# Altium PCB PCB_Z35.PcbDoc (part 3 of 3)
Units mm, origin at the board's own origin, x right, y up, seen from the top; angles counter-clockwise.
Board outline 116.46 x 196.34 mm, 2 copper layers (Top Layer, Bottom Layer), stack 1.671 mm thick; 178 components, 183 nets, 705 pads, 291 vias.
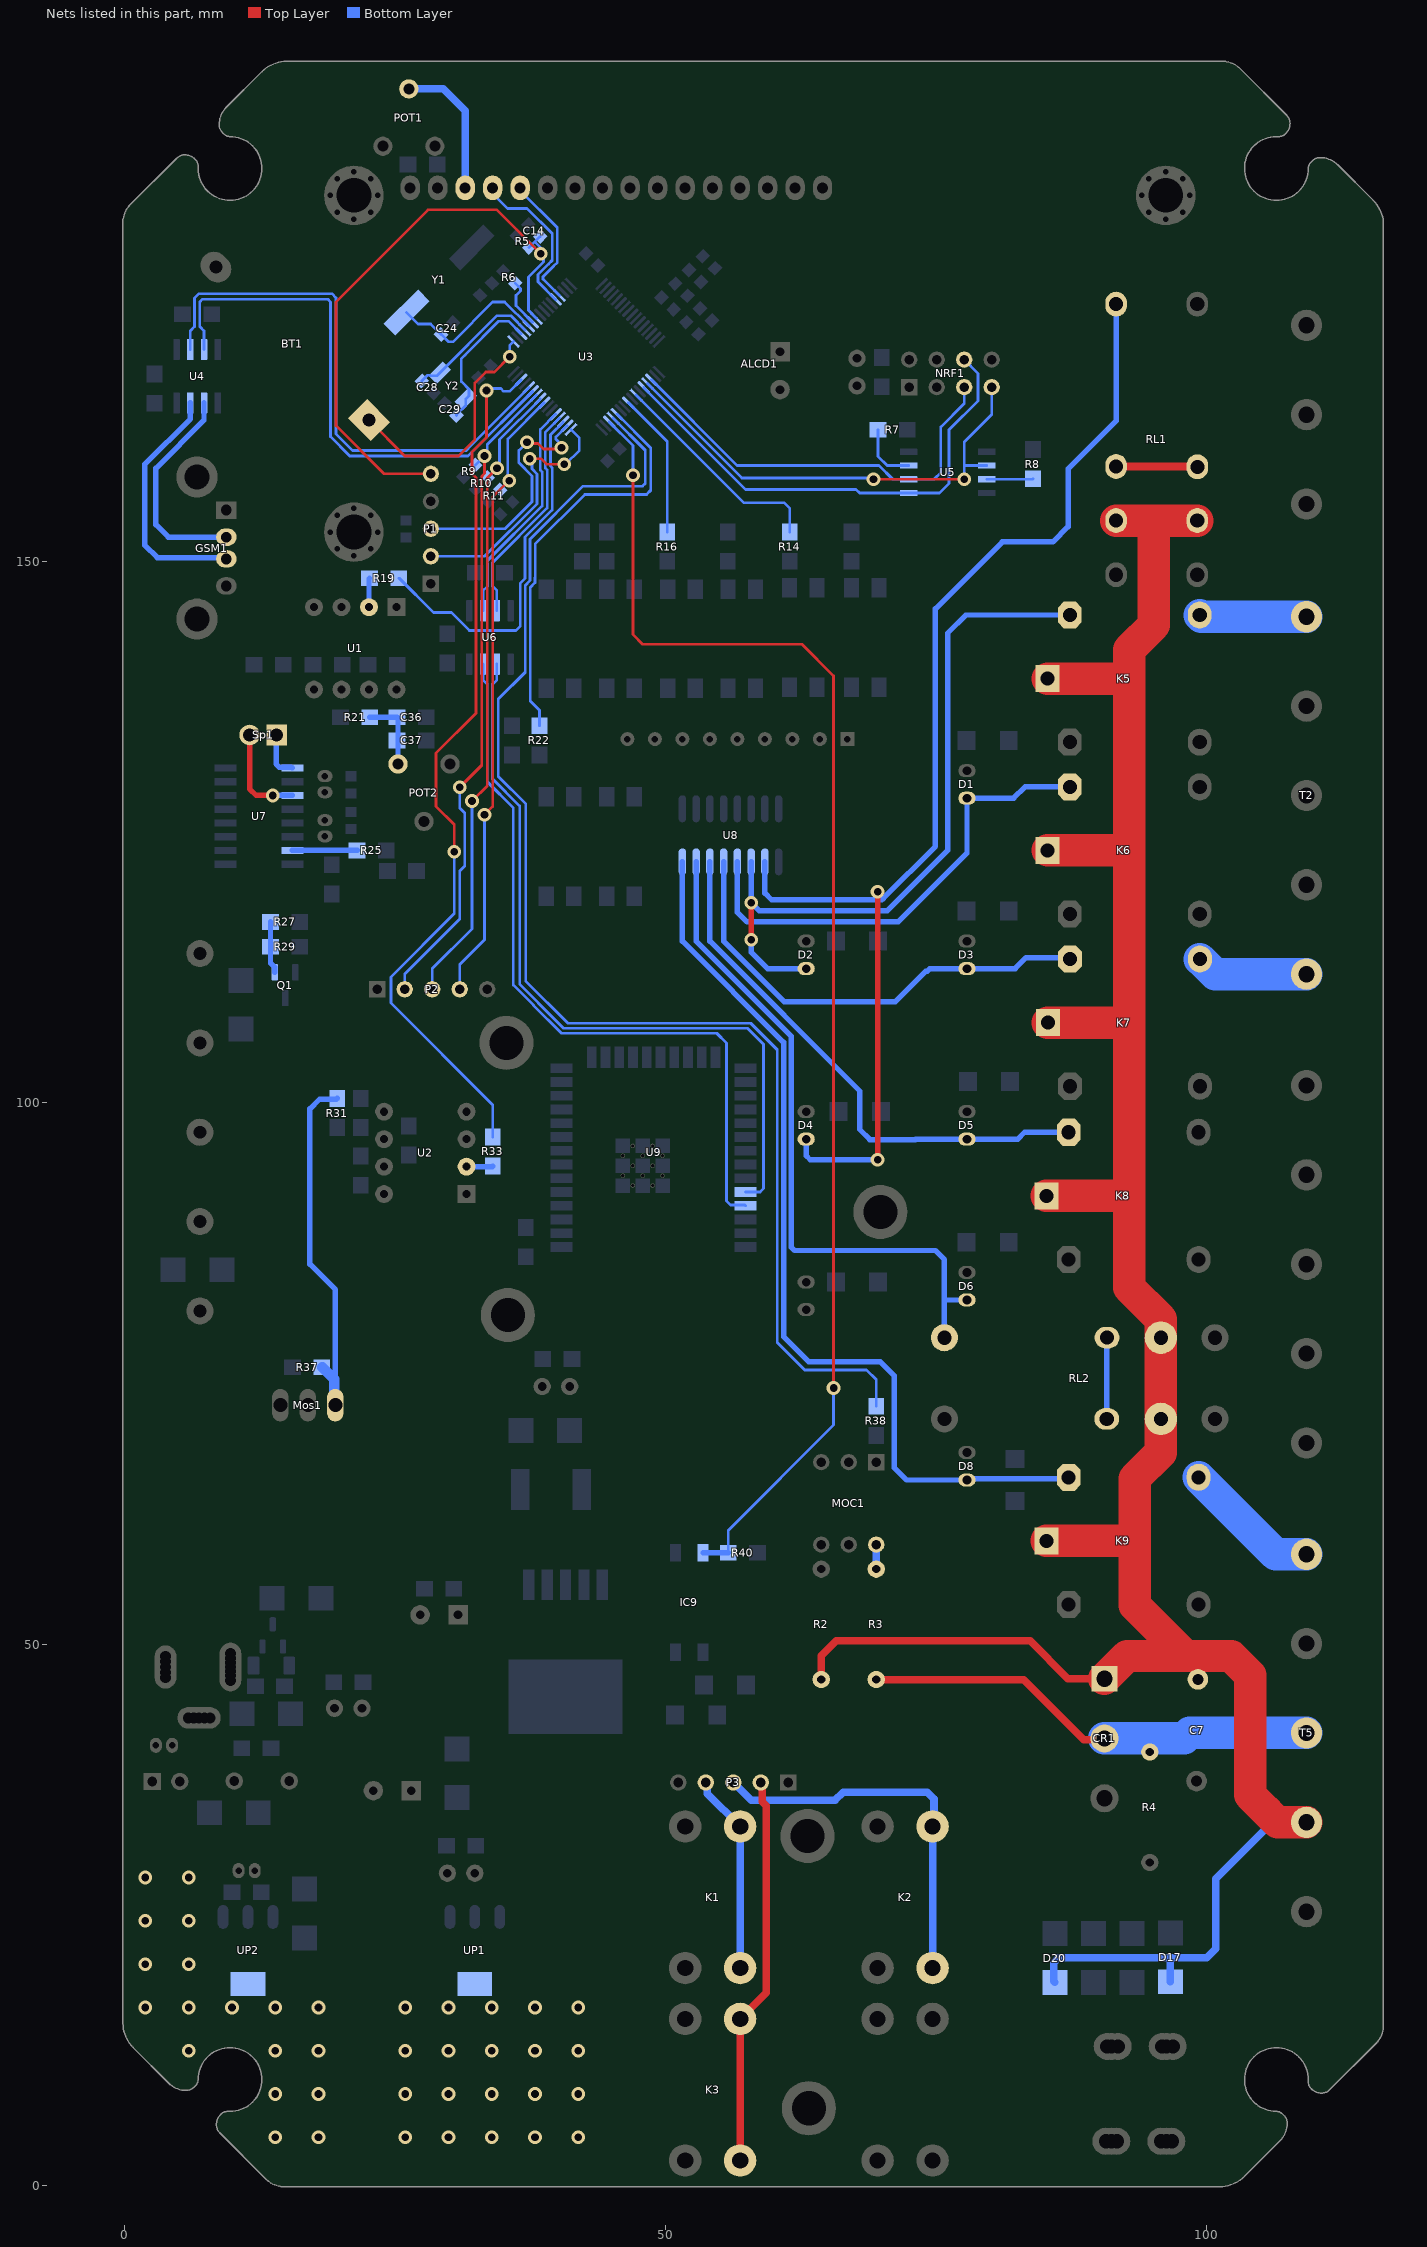
[diagram p3: the nets of this part, all layers, seen from the top]

## Via types
v1: diameter 1.27, hole 0.711, Top Layer to Bottom Layer, tented both sides, 237 vias
v2: diameter 0.5, hole 0.3, Top Layer to Bottom Layer, 40 vias
v3: diameter 1.6, hole 1, Top Layer to Bottom Layer, tented both sides, 8 vias
v4: diameter 0.5, hole 0.3, Top Layer to Bottom Layer, tented both sides, 6 vias

## Nets (pads, with @x,y where several pads share a name; then routed paths per layer and width w, separated by ;. In a path a pad name is that pad's centre, name@x,y a point inside that pad or via, vN(x,y) a via of type N, cw(c..) or ccw(c..) an arc to the next point about the centre after c; other vN are vias at no path point) (continued)
NetMOC1_6: MOC1.6 R3.1 | length 2.3
  Bottom Layer w0.7: R3.1@69.469,56.916 MOC1.6@69.469,59.182
NetMos1_1: Mos1.1 R31.1 R37.2 | length 35.1
  Bottom Layer w0.5: Mos1.1@19.495,72.072 19.495,82.74 17.145,85.09 17.145,99.441 18.034,100.33 19.605,100.33 R31.1@19.685,100.41
  Bottom Layer w1: R37.2@18.292,75.565 19.398,74.458 Mos1.1@19.398,72.169
NetQ1_1: Q1.1 R27.2 R29.1 | length 4.8
  Bottom Layer w0.5: R27.2@13.509,116.713 R29.1@13.509,114.427 13.509,112.911 13.909,112.511 Q1.1@13.909,112.061
NetQ4_1: 
NetQ5_1: 
NetQ6_1: 
NetQ6_3: 
NetQ7_1: 
NetQ7_4: 
NetQ7_5: 
NetR7_1: R7.1 U5.7 | length 5.6
  Bottom Layer w0.254: R7.1@69.643,162.179 69.643,159.719 70.485,158.877 U5.7@72.468,158.877
NetR8_1: R8.1 U5.3 | length 4.3
  Bottom Layer w0.254: U5.3@79.678,157.607 83.9,157.607 R8.1@83.947,157.654
NetR19_1: R19.1 U1.2 | length 2.7
  Bottom Layer w0.5: U1.2@22.606,145.796 22.606,148.416 R19.1@22.653,148.463
NetR25_2: R25.2 U7.7 | length 6
  Bottom Layer w0.5: U7.7@15.519,123.317 R25.2@21.51,123.317
NetR33_1: R33.1 U2.2 | length 2.4
  Bottom Layer w0.5: U2.2@31.623,94.107 33.989,94.107 R33.1@34.036,94.154
NetR60_1: 
NetR61_1: 
NetR62_1: 
NetR71_1: 
NetR72_1: 
NetR73_2: 
NetR76_1: 
NetRL1_12: RL1.12 RL1.22 | length 7.5
  Top Layer w0.4: RL1.12@99.107,158.79 cw(c99.107,158.76) RL1.12@99.137,158.76
  Top Layer w0.7: RL1.22@91.627,158.79 RL1.12@99.107,158.79
NetRL2_12: RL2.12 RL2.22 | length 7.5
  Bottom Layer w0.5: RL2.22@90.765,70.799 90.78,70.814 90.78,78.294 RL2.12@90.795,78.309
NetSp1_1: Sp1.1 U7.1 | length 4.4
  Bottom Layer w0.5: Sp1.1@14.077,133.985 14.021,133.929 14.021,131.31 14.314,131.017 15.439,131.017 U7.1@15.519,130.937
NetSp1_2: Sp1.2 U7.3 | length 9.2
  Top Layer w0.5: Sp1.2@11.577,133.985 11.577,129.012 12.192,128.397 v1(13.716,128.397)
  Bottom Layer w0.5: v1(13.716,128.397) U7.3@15.519,128.397
"Night lamp": R22.2 U3.44 | length 38.4
  Bottom Layer w0.254: R22.2@38.354,134.827 38.354,136.271 37.504,137.121 37.504,147.606 37.952,148.054 37.952,148.507 37.955,148.511 37.955,151.62 42.545,156.21 48.26,156.21 48.641,156.591 48.641,160.49 U3.44@45.511,163.621
"Night lamp out": K9.3 T5.5 | length 12.9
  Bottom Layer w3: K9.3@99.249,65.405 106.361,58.293 T5.5@109.22,58.293
NRST: C14.1 P1.5 R5.1 U3.7 | length 56.2
  Top Layer w0.254: P1.5@28.321,158.115 24.003,158.115 19.558,162.56 19.558,173.99 28.067,182.499 34.417,182.499 v1(38.481,178.435)
  Bottom Layer w0.254: R5.1@37.396,179.012 38.404,180.021 C14.1@38.434,180.021 ; 37.996,179.473 v1@38.735,178.734 ; U3.7@38.086,172.459 38.086,172.477 37.338,173.225 37.338,176.276 38.735,177.673 v1@38.735,178.734 ; v1(38.481,178.435) 38.481,178.48 v1@38.735,178.734
OSC32_IN: C29.1 U3.3 Y2.2 | length 13.5
  Bottom Layer w0.254: C29.1@30.687,163.511 30.687,163.575 31.555,164.443 Y2.2@31.555,165.041 31.838,165.324 31.838,165.922 31.138,166.622 31.138,168.752 31.459,169.074 31.474,169.074 31.623,169.222 31.623,169.237 34.598,172.212 35.505,172.212 U3.3@36.672,171.045
OSC32_OUT: C28.1 U3.4 Y2.1 | length 12.6
  Bottom Layer w0.254: C28.1@27.479,166.689 28.006,167.216 28.216,167.216 28.27,167.162 28.868,167.162 Y2.1@29.151,167.445 29.16,167.445 34.435,172.72 35.704,172.72 U3.4@37.025,171.399
OSC_IN: C24.1 U3.5 Y1.1 | length 14.9
  Bottom Layer w0.254: Y1.1@26.078,173.017 27.137,171.958 28.303,171.958 C24.1@29.272,170.989 29.29,170.989 29.972,170.307 30.353,170.307 34.036,173.99 35.141,173.99 U3.5@37.379,171.752
OSC_OUT: R6.2 U3.6 | length 4.6
  Bottom Layer w0.254: R6.2@36.126,175.71 36.609,175.227 36.609,175.017 36.195,174.603 36.195,173.643 U3.6@37.732,172.106
output1: D8.2 K9.5 U8.16 | length 84.6
  Bottom Layer w0.5: U8.16@51.562,122.264 51.562,114.935 60.912,105.585 60.912,78.407 63.246,76.073 69.85,76.073 71.12,74.803 71.12,66.294 72.263,65.151 D8.2@77.851,65.151 77.978,65.278 87.122,65.278 K9.5@87.249,65.405
output2: D6.2 RL2.A1 U8.15 | length 63.2
  Bottom Layer w0.5: U8.15@52.832,122.264 52.832,114.935 61.622,106.145 61.622,86.653 61.915,86.36 74.93,86.36 75.765,85.525 75.765,81.788 ; RL2.A1@75.765,78.299 75.765,81.788 ; D6.2@77.851,81.788 75.765,81.788
output3: D5.2 K8.5 U8.14 | length 50.4
  Bottom Layer w0.5: U8.14@54.102,122.264 54.102,114.935 67.945,101.092 67.945,97.536 68.881,96.6 73.081,96.6 73.128,96.647 D5.2@77.851,96.647 82.55,96.647 83.185,97.282 K8.5@87.249,97.282
output4: D3.2 K7.5 U8.13 | length 43.4
  Bottom Layer w0.5: U8.13@55.372,122.264 55.372,114.935 60.96,109.347 71.247,109.347 74.041,112.141 74.168,112.141 74.422,112.395 D3.2@77.851,112.395 82.296,112.395 83.312,113.411 87.249,113.411 K7.5@87.376,113.284
output5: D1.2 K6.5 U8.12 | length 43.9
  Bottom Layer w0.5: U8.12@56.642,122.264 56.642,117.602 57.531,116.713 71.501,116.713 77.851,123.063 D1.2@77.851,128.143 82.169,128.143 83.218,129.192 K6.5@87.354,129.192
output6: D2.2 K5.5 U8.11 | length 66.9
  Top Layer w0.5: v1(57.912,115.062) v1(57.912,118.491)
  Bottom Layer w0.5: v1(57.912,115.062) 57.912,113.919 59.436,112.395 D2.2@62.992,112.395 ; U8.11@57.912,122.264 v1(57.912,118.491) 58.674,117.729 70.485,117.729 76.073,123.317 76.073,143.383 77.757,145.067 K5.5@87.354,145.067
output7: D4.2 RL1.A2 U8.10 | length 114.6
  Top Layer w0.5: v1(69.596,94.742) v1(69.596,119.507)
  Bottom Layer w0.5: U8.10@59.182,122.264 59.182,119.38 59.817,118.745 69.977,118.745 70.104,118.872 ; D4.2@62.992,96.647 62.992,95.123 63.373,94.742 v1(69.596,94.742) ; v1(69.596,119.507) 69.596,119.38 70.104,118.872 ; RL1.A2@91.627,173.79 91.627,163.001 87.197,158.571 87.197,153.237 85.788,151.828 81.13,151.828 74.93,145.629 74.93,123.698 70.104,118.872
P220: C7.2 CR1.1 D17.1 D20.2 K5.1 K6.1 K7.1 K8.1 K9.1 R2.2 RL1.11 RL1.21 RL2.11 RL2.21 T5.2 | length 257.8
  Top Layer w0.7: R2.2@64.389,46.716 64.389,48.895 65.786,50.292 83.693,50.292 87.185,46.8 CR1.1@90.551,46.8 ; C7.2@99.187,46.736 99.418,46.967 99.418,48.237 100.076,48.895
  Top Layer w3: K9.1@85.199,59.53 93.345,59.53 ; K8.1@85.199,91.407 92.837,91.407 ; K6.1@85.304,123.317 92.837,123.317 ; K5.1@85.304,139.192 92.837,139.192 ; K7.1@85.326,107.409 92.837,107.409 ; CR1.1@90.551,46.8 92.646,48.895 98.044,48.895 ; RL1.21@91.627,153.79 95.123,153.79 ; RL1.11@99.127,153.79 95.123,153.79 ; T5.2@109.22,33.528 106.553,33.528 105.539,34.542 104.013,36.068 104.013,47.138 102.256,48.895 100.076,48.895 98.044,48.895 ; 92.837,91.407 92.837,82.938 95.765,80.01 RL2.11@95.765,78.299 RL2.21@95.765,70.799 95.758,70.792 95.758,67.691 93.345,65.278 93.345,59.53 ; 92.837,91.407 92.837,107.409 ; 92.837,107.409 92.837,123.317 ; 92.837,123.317 92.837,139.192 ; 92.837,139.192 92.837,141.859 95.123,144.145 95.123,153.79 ; 93.345,59.53 93.345,53.594 98.044,48.895
  Bottom Layer w0.7: D20.2@85.979,18.741 85.852,18.868 85.852,20.574 86.284,21.006 96.647,21.006 ; D17.1@96.647,18.796 96.647,21.006 ; T5.2@109.22,33.528 106.045,33.528 100.838,28.321 100.838,21.844 100,21.006 96.647,21.006
PAM8403: C36.1 C37.1 POT2.2 R21.1 | length 6.9
  Bottom Layer w0.5: R21.1@22.686,135.636 C36.1@25.193,135.636 25.286,135.543 POT2.2@25.286,131.301
"PAM8403 STM32": R19.2 U3.51 | length 34.1
  Bottom Layer w0.254: R19.2@25.353,148.463 25.403,148.463 28.578,145.288 30.226,145.288 31.877,143.637 36.195,143.637 36.576,144.018 36.576,147.99 37.024,148.438 37.024,148.892 37.027,148.895 37.027,152.258 39.531,154.762 39.531,158.674 39.365,158.84 39.365,161.718 U3.51@40.561,162.914
RS: ALCD1.4 U3.12 | length 14.9
  Bottom Layer w0.254: ALCD1.4@34.036,184.531 34.036,184.005 35.415,182.626 37.211,182.626 39.541,180.296 39.541,177.844 39.199,177.502 39.199,177.481 38.227,176.509 38.227,175.854 U3.12@39.854,174.227
RW: ALCD1.5 U3.13 | length 12.5
  Bottom Layer w0.254: ALCD1.5@36.576,184.531 36.576,184.277 40.005,180.848 40.005,177.652 39.663,177.31 39.663,177.289 38.691,176.317 38.691,176.097 U3.13@40.207,174.581
"RXD ESP32": U6.6 U9.34 | length 70.8
  Bottom Layer w0.254: U6.6@34.417,140.532 34.417,139.065 33.992,138.64 33.992,129.965 36.523,127.434 36.523,110.966 38.266,109.223 38.266,109.202 40.578,106.89 57.575,106.89 59.055,105.41 59.055,92.075 58.748,91.768 U9.34@57.395,91.768
"RXD GSM": GSM1.2 U4.6 | length 20.1
  Bottom Layer w0.5: U4.6@7.366,164.662 7.366,163.068 2.921,158.623 2.921,153.416 4.08,152.257 GSM1.2@9.427,152.257
SCL: 
SCL_ADC_PIR: 
SDA: 
"Setting button 1": P2.2 R9.2 U3.58 | length 61.1
  Top Layer w0.254: v1(30.988,129.159) 33.02,131.191 33.02,157.882 33.274,158.136 v1(33.274,159.766)
  Bottom Layer w0.254: P2.2@25.908,110.49 25.908,111.887 30.988,116.967 30.988,121.412 31.452,121.876 31.452,126.79 30.988,127.254 v1(30.988,129.159) ; R9.2@32.443,158.935 v1(33.274,159.766) ; v1@33.528,160.02 33.528,160.83 U3.58@38.086,165.388
"Setting button 1 K": K1.1 P3.4 | length 18.5
  Bottom Layer w0.7: P3.4@53.721,37.211 53.87,37.062 53.87,36.173 K1.1@56.896,33.147 K1.1@56.896,20.066
"Setting button 2": P2.4 R11.2 U3.56 | length 58.7
  Top Layer w0.254: v1(33.274,126.619) 34.036,127.381 34.036,155.956 v1(35.56,157.48)
  Bottom Layer w0.254: P2.4@30.988,110.49 30.988,112.776 33.274,115.062 v1(33.274,126.619) ; R11.2@34.729,156.649 v1(35.56,157.48) 35.433,157.607 35.433,161.321 U3.56@38.793,164.681
"Setting button 2 K": K3.1 P3.2 | length 36.1
  Top Layer w0.7: K3.1@56.896,2.286 K3.1@56.896,15.367 59.309,17.78 59.309,35.052 58.95,35.411 58.95,37.062 P3.2@58.801,37.211
"SPI2 MISO": NRF1.7 U3.36 U5.2 | length 44.6
  Top Layer w0.254: v1(69.215,157.607) v1(77.597,157.607)
  Bottom Layer w0.254: U3.36@48.339,166.449 57.054,157.734 69.088,157.734 v1(69.215,157.607) ; v1(77.597,157.607) 77.597,158.877 ; U5.2@79.678,158.877 77.597,158.877 ; NRF1.7@80.137,166.116 80.137,163.576 77.597,161.036 77.597,158.877
"SPI2 MOSI": NRF1.6 U3.37 U5.5 | length 45.7
  Bottom Layer w0.254: U3.37@47.986,166.096 57.407,156.674 67.608,156.674 67.945,156.337 U5.5@72.468,156.337 75.311,156.337 76.2,157.226 76.2,162.179 78.867,164.846 78.867,167.386 NRF1.6@77.597,168.656
"SPI2 SCK": NRF1.5 U3.35 U5.6 | length 39.6
  Bottom Layer w0.254: U3.35@48.693,166.803 56.618,158.877 69.723,158.877 70.993,157.607 U5.6@72.468,157.607 74.803,157.607 75.438,158.242 75.438,162.433 77.597,164.592 NRF1.5@77.597,166.116
"Status botton": 
Sun: R38.2 U3.45 | length 129.1
  Bottom Layer w0.254: U3.45@45.157,163.267 48.133,160.291 48.133,157.226 47.879,156.972 42.397,156.972 37.491,152.066 37.491,148.703 37.488,148.7 37.488,148.246 37.04,147.798 37.04,139.783 34.544,137.287 34.544,135.763 34.544,130.175 37.084,127.635 37.084,111.252 40.982,107.354 57.873,107.354 60.325,104.902 60.325,77.851 62.865,75.311 68.58,75.311 69.469,74.422 R38.2@69.469,71.962
"Sun 12v LED": R33.2 U3.62 | length 82
  Top Layer w0.254: v1(30.48,123.19) 30.48,125.719 28.807,127.392 28.807,132.312 32.49,135.995 32.49,157.756 32.124,158.122 32.124,160.14 33.463,161.479 v1(33.463,165.8)
  Bottom Layer w0.254: v1(30.48,123.19) 30.48,117.475 24.638,111.633 24.638,109.22 34.036,99.822 R33.2@34.036,96.854 ; v1(33.463,165.8) 33.486,165.777 33.697,165.777 33.909,165.989 34.798,165.989 35.052,165.735 35.604,165.735 U3.62@36.672,166.803
"Sun out": CR1.2 R3.2 R4.2 T5.3 | length 42.3
  Top Layer w0.7: R3.2@69.469,46.716 83.078,46.716 88.646,41.148 90.424,41.148 CR1.2@90.551,41.275
  Bottom Layer w3: CR1.2@90.551,41.275 97.917,41.275 98.425,41.783 T5.3@109.22,41.783
SWCLK: P1.3 U3.50 | length 22.9
  Top Layer w0.254: v1(37.211,161.036) 37.338,160.909 38.227,160.909 38.735,160.401 40.259,160.401 v1(40.386,160.528)
  Bottom Layer w0.254: P1.3@28.321,153.035 35.179,153.035 37.675,155.531 37.675,157.905 36.449,159.131 36.449,160.274 v1(37.211,161.036) ; v1(40.386,160.528) 40.386,160.782 39.866,161.302 39.866,161.512 U3.50@40.914,162.56
SWDIO: P1.2 U3.49 | length 23.8
  Top Layer w0.254: v1(37.465,159.512) 38.481,159.512 38.989,159.004 v1(40.64,159.004)
  Bottom Layer w0.254: P1.2@28.321,150.495 33.295,150.495 38.139,155.339 38.139,158.097 37.659,158.577 37.659,159.318 v1(37.465,159.512) ; v1(40.64,159.004) 40.767,159.004 42.037,160.274 42.037,161.437 U3.49@41.268,162.206
"Tab 3.3 stm32": UP2.4
  other v1: 13.947,4.424 17.947,4.424 13.947,8.424 17.947,8.424 5.947,12.424 13.947,12.424 17.947,12.424 1.947,16.424 5.947,16.424 9.947,16.424 13.947,16.424 17.947,16.424 1.947,20.424 5.947,20.424 1.947,24.424 5.947,24.424 1.947,28.424 5.947,28.424
"Tab 5v": UP1.4
  other v1: 25.947,4.424 29.947,4.424 33.947,4.424 37.947,4.424 41.947,4.424 25.947,8.424 29.947,8.424 33.947,8.424 37.947,8.424 41.947,8.424 25.947,12.424 29.947,12.424 33.947,12.424 37.947,12.424 41.947,12.424 25.947,16.424 29.947,16.424 33.947,16.424 37.947,16.424 41.947,16.424
"Timer 1": R14.2 U3.39 | length 20.7
  Bottom Layer w0.254: U3.39@47.278,165.388 57.219,155.448 60.96,155.448 61.468,154.94 R14.2@61.468,152.734
"Timer 1 out": K5.3 T2.5 | length 9.9
  Bottom Layer w3: K5.3@99.354,145.067 99.514,144.907 T2.5@109.22,144.907
"Timer 2": R16.2 U3.41 | length 13.4
  Bottom Layer w0.254: U3.41@46.571,164.681 50.165,161.088 R16.2@50.165,152.734
"Timer 2 out": K7.3 T2.1 | length 10.4
  Bottom Layer w3: K7.3@99.376,113.284 100.773,111.887 T2.1@109.22,111.887
"TXD ESP32": U6.7 U9.35 | length 69.3
  Bottom Layer w0.254: U6.7@33.147,140.532 33.147,139.065 33.528,138.684 33.528,129.667 35.941,127.254 35.941,110.892 37.802,109.031 37.802,109.01 40.386,106.426 54.737,106.426 55.626,105.537 55.626,90.932 56.007,90.551 57.342,90.551 U9.35@57.395,90.498
"TXD GSM": GSM1.3 U4.7 | length 22.9
  Bottom Layer w0.5: U4.7@6.096,164.662 6.096,163.195 1.905,159.004 1.905,151.511 3.048,150.368 9.316,150.368 GSM1.3@9.427,150.257
"UART4 RX - ESP32": U3.53 U6.2 | length 21.1
  Bottom Layer w0.254: U6.2@33.147,145.472 33.147,147.32 33.544,147.717 33.544,149.836 33.536,149.844 33.536,149.971 33.536,150.08 38.603,155.147 38.603,158.289 38.437,158.455 38.437,162.204 U3.53@39.854,163.621
"UART4 TX - ESP32": U3.52 U6.3 | length 20.7
  Bottom Layer w0.254: U6.3@34.417,145.472 34.417,147.32 34.01,147.727 34.01,149.897 39.067,154.954 39.067,158.482 38.901,158.648 38.901,161.961 U3.52@40.207,163.267
"Up button": P2.3 R10.2 U3.57 | length 59.9
  Top Layer w0.254: v1(32.131,127.889) 33.528,129.286 33.528,157.734 v1(34.425,158.631)
  Bottom Layer w0.254: P2.3@28.448,110.49 28.448,112.395 32.131,116.078 v1(32.131,127.889) ; R10.2@33.586,157.792 34.671,158.877 34.671,161.266 U3.57@38.44,165.035
"Up button K": K2.1 P3.3 | length 35.5
  Bottom Layer w0.7: P3.3@56.261,37.211 57.912,35.56 65.659,35.56 66.421,36.322 74.168,36.322 74.803,35.687 74.803,33.274 K2.1@74.676,33.147 K2.1@74.676,20.066
"USART1 RX - GSM": U3.60 U4.2 | length 51.8
  Bottom Layer w0.254: U4.2@6.096,169.602 6.096,171.323 6.477,171.704 6.477,171.966 6.493,171.982 6.493,174.355 6.89,174.752 19.177,174.752 19.558,174.371 19.558,161.798 21.082,160.274 31.601,160.274 31.75,160.423 31.75,160.467 U3.60@37.379,166.096
"USART1 TX - GSM": U3.59 U4.3 | length 51.2
  Bottom Layer w0.254: U4.3@7.366,169.602 7.366,171.323 6.969,171.72 6.969,173.974 7.239,174.244 18.796,174.244 19.05,173.99 19.05,161.544 20.828,159.766 31.757,159.766 U3.59@37.732,165.742
VBAT: BT1.1 U3.1 | length 22.8
  Top Layer w0.254: BT1.1@22.606,163.068 25.908,159.766 30.861,159.766 32.385,161.29 32.385,166.497 33.401,167.513 34.195,167.513 v1(35.606,168.924)
  Bottom Layer w0.254: v1(35.606,168.924) 35.606,169.979 U3.1@35.965,170.338
VEE: ALCD1.3 POT1.3 | length 13.2
  Bottom Layer w0.7: POT1.3@26.289,193.675 29.464,193.675 31.496,191.643 ALCD1.3@31.496,184.531
"Voltage detect": IC9.4 R40.2 U3.46 | length 128.1
  Top Layer w0.254: v1(46.99,157.988) 46.99,143.256 47.879,142.367 62.611,142.367 65.532,139.446 v1(65.532,73.66)
  Bottom Layer w0.254: U3.46@44.804,162.914 46.99,160.727 v1(46.99,157.988) ; R40.2@55.8,58.42 55.8,60.499 65.532,70.231 v1(65.532,73.66)
  Bottom Layer w0.5: IC9.4@53.467,58.441 53.488,58.42 R40.2@55.8,58.42
pads on no net: ALCD1.MH DZ1.0 J1.3 K5.2 K6.2 K7.2 K8.2 K9.2 M1.S M2.S M3.S M4.S M5.S MOC1.3 MOC1.5 R1.2 U1.1 U1.4 U2.1 U2.4 U3.2 U3.8 U3.9 U3.10 U3.11 U3.21 U3.22 U3.23 U3.24 U3.25 U3.54 U7.9 U7.10 U7.12 U7.14 U7.16 U9.3 U9.4 U9.5 U9.6 U9.7 U9.8 U9.9 U9.10 U9.11 U9.12 U9.13 U9.14 U9.16 U9.17 U9.18 U9.19 U9.20 U9.21 U9.22 U9.23 U9.24 U9.25 U9.26 U9.27 U9.28 U9.29 U9.30 U9.31 U9.32 U9.33 U9.36 U9.37
copper on no net:
  other v2: 63.246,5.112 61.832,5.698 64.66,5.698 61.246,7.112 65.246,7.112 61.832,8.526 64.66,8.526 63.246,9.112 63.119,30.258 61.705,30.844 64.533,30.844 61.119,32.258 65.119,32.258 61.705,33.672 64.533,33.672 63.119,34.258 35.433,78.391 34.019,78.977 36.847,78.977 33.433,80.391 37.433,80.391 34.019,81.805 36.847,81.805 35.433,82.391 69.85,87.916 68.436,88.502 71.264,88.502 67.85,89.916 71.85,89.916 68.436,91.33 71.264,91.33 69.85,91.916 35.306,103.537 33.892,104.123 36.72,104.123 33.306,105.537 37.306,105.537 33.892,106.951 36.72,106.951 35.306,107.537

## Polygon pours and split planes (outlines as drawn)
GND-3.3v on Bottom Layer "GND-3.3V_L02_P036" (solid, remove dead copper, pour order 36): 13.843,195.961 13.97,196.088 63.337,196.088 cw(c63.337,193.548) 65.133,195.344 87.521,172.956 cw(c85.725,171.16) 88.265,171.16 88.265,162.723 cw(c85.725,162.723) 87.521,160.927 86.36,159.766 ccw(c87.28,158.846) 85.979,158.846 85.979,153.924 cw(c85.09,153.924) 85.09,153.035 81.026,153.035 ccw(c81.026,152.115) 80.376,152.766 72.118,144.508 cw(c70.322,146.304) 70.322,143.764 17.943,143.764 cw(c17.943,146.304) 16.147,144.508 14.968,145.687 cw(c16.764,147.483) 14.224,147.483 14.224,162.651 ccw(c11.684,162.651) 13.48,164.447 10.795,167.132 ccw(c9.569,165.906) 9.569,167.64 0,167.64 0,181.61 cw(c1.84,181.61) 0.539,182.911 5.715,188.087
GND-12v on Bottom Layer "GND-12V_L02_P037" (solid, remove dead copper, pour order 37): 0,141.605 78.359,141.605 cw(c78.359,140.208) 79.756,140.208 79.756,94.869 cw(c77.916,94.869) 79.217,93.568 72.245,86.596 ccw(c74.041,84.8) 71.501,84.8 71.501,66.802 cw(c68.961,66.802) 68.961,64.262 49.022,64.262 ccw(c48.831,61.214) 45.783,61.405 46.108,23.996 cw(c44.337,23.996) 44.337,22.225 28.702,22.225 cw(c28.702,22.987) 27.94,22.987 27.94,36.83 ccw(c25.794,36.83) 27.311,38.348 24.874,40.785 ccw(c23.078,38.989) 23.078,41.529 0,41.529
GND-3.3v on Top Layer "GND-3.3V_L01_P034" (solid, remove dead copper, pour order 34): 13.843,195.961 13.97,196.088 63.337,196.088 cw(c63.337,193.548) 65.133,195.344 87.521,172.956 cw(c85.725,171.16) 88.265,171.16 88.265,162.723 cw(c85.725,162.723) 87.521,160.927 86.36,159.766 ccw(c87.28,158.846) 85.979,158.846 85.979,153.924 cw(c85.09,153.924) 85.09,153.035 81.026,153.035 ccw(c81.026,152.115) 80.376,152.766 72.118,144.508 cw(c70.322,146.304) 70.322,143.764 17.943,143.764 cw(c17.943,146.304) 16.147,144.508 14.968,145.687 cw(c16.764,147.483) 14.224,147.483 14.224,162.651 ccw(c11.684,162.651) 13.48,164.447 10.795,167.132 ccw(c9.569,165.906) 9.569,167.64 0,167.64 0,181.61 cw(c1.84,181.61) 0.539,182.911 5.715,188.087
GND-12v on Top Layer "GND-12V_L01_P035" (solid, remove dead copper, pour order 35): 0,141.605 78.359,141.605 cw(c78.359,140.208) 79.756,140.208 79.756,94.869 cw(c77.917,94.869) 79.217,93.568 72.245,86.596 ccw(c74.041,84.8) 71.501,84.8 71.501,66.802 cw(c68.961,66.802) 68.961,64.262 48.641,64.262 ccw(c48.196,62.04) 45.974,62.484 45.974,25.4 cw(c43.18,25.019) 43.561,22.225 28.702,22.225 cw(c28.702,22.987) 27.94,22.987 27.94,36.83 ccw(c25.794,36.83) 27.311,38.348 24.874,40.785 ccw(c23.078,38.989) 23.078,41.529 0,41.529

## Keep-outs
Keep-Out Layer:
  lines w0.254: 0,181.356 cw(c2.146,181.356) 0.629,182.874 4.938,187.183 cw(c5.588,186.532) 5.588,187.452 cw(c5.588,186.226) 6.455,187.093 ; 0,181.61 0,179.959 0,15.494 0,14.986 ccw(c3.066,14.986) 0.898,12.818 4.197,9.519 ccw(c5.715,11.036) 5.715,8.89 ccw(c5.715,9.81) 6.365,9.159 6.489,9.283 ccw(c5.993,9.778) 6.694,9.778 cw(c9.766,9.766) 9.779,6.694 9.541,6.694 ccw(c9.541,5.953) 9.017,6.477 8.995,6.455 ccw(c9.862,5.588) 8.636,5.588 ccw(c9.556,5.588) 8.905,4.938 13.214,0.629 ccw(c14.732,2.146) 14.732,0 ; 6.477,187.071 cw(c5.953,186.547) 6.694,186.547 ; 6.702,186.547 ccw(c9.766,186.322) 9.778,189.394 cw(c9.778,190.095) 9.283,189.599 ; 14.478,0 16.129,0 101.219,0 ccw(c101.219,3.066) 103.387,0.898 106.686,4.197 ccw(c105.169,5.715) 107.315,5.715 ccw(c106.395,5.715) 107.046,6.365 106.922,6.489 ccw(c106.427,5.993) 106.427,6.694 cw(c106.439,9.766) 109.503,9.541 ; 101.473,196.088 cw(c101.473,193.942) 102.991,195.459 107.3,191.15 cw(c106.649,190.5) 107.569,190.5 cw(c106.343,190.5) 107.21,189.633 ; 101.727,196.088 100.076,196.088 14.986,196.088 ccw(c14.986,193.022) 12.818,195.19 9.519,191.891 ccw(c11.036,190.373) 8.89,190.373 ccw(c9.81,190.373) 9.144,189.738 ; 106.679,189.385 ccw(c106.439,186.322) 109.511,186.31 cw(c110.212,186.31) 109.716,186.805 109.84,186.929 cw(c110.49,186.278) 110.49,187.198 cw(c110.49,185.052) 112.008,186.569 115.307,183.27 cw(c113.139,181.102) 116.205,181.102 116.205,16.129 116.205,14.478 ; 106.679,189.394 ccw(c106.664,190.135) 107.188,189.611 ; 109.511,9.541 ccw(c110.252,9.541) 109.728,9.017 ; 109.75,8.995 ccw(c110.617,9.862) 110.617,8.636 ccw(c110.617,9.556) 111.267,8.905 115.576,13.214 ccw(c114.059,14.732) 116.205,14.732 ; 9.144,189.738 ccw(c9.145,189.738) 9.144,189.738 ; 9.144,189.738 9.282,189.6 ; 9.283,189.599 ccw(c9.282,189.599) 9.282,189.6

## Other copper
Top Layer:
  region net P220: 90.542,154.804 cw(c91.768,153.578) 91.768,155.312 98.788,155.312 cw(c98.788,153.144) 100.321,154.677 cw(c99.708,154.064) 100.575,154.064 100.575,152.645 cw(c98.429,152.645) 99.946,151.127 99.686,150.867 cw(c98.92,151.819) 98.788,150.604 97.886,150.486 ccw(c97.886,149.619) 97.273,150.232 ccw(c97.579,149.925) 97.146,149.925 97.146,143.664 cw(c94.606,143.664) 96.402,141.868 93.082,138.548 cw(c92.162,139.468) 92.162,138.167 89.758,138.167 cw(c89.758,139.034) 89.145,138.421 cw(c89.452,138.728) 89.018,138.728 89.018,140.58 cw(c89.631,140.58) 89.198,141.014 92.453,144.269 ccw(c90.977,146.081) 93.302,145.844 93.302,150.398 ccw(c92.587,149.845) 92.527,150.747 91.177,150.747 cw(c91.217,152.245) 90.23,151.117 cw(c91.226,151.494) 90.161,151.494 90.161,154.191 cw(c91.028,154.191) 90.415,154.804
  region net "Tab 5v": 24.003,20.955 ccw(c24.003,20.447) 23.495,20.447 23.495,1.016 ccw(c24.003,1.016) 24.003,0.508 42.382,0.508 ccw(c42.382,3.048) 44.178,1.252 45.611,2.685 ccw(c43.815,4.481) 46.355,4.481 46.355,20.193 ccw(c45.593,20.193) 45.593,20.955
  region net "Tab 3.3 stm32": 8.763,20.955 cw(c8.763,21.844) 7.874,21.844 7.874,30.226 ccw(c6.985,30.226) 6.985,31.115 1.27,31.115 ccw(c1.27,30.48) 0.635,30.48 0.635,15.022 ccw(c3.175,15.022) 1.379,13.226 4.588,10.017 ccw(c5.579,11.594) 5.993,9.778 ccw(c5.993,10.024) 6.167,9.85 6.223,9.906 6.223,10.251 cw(c8.763,10.251) 6.967,12.047 7.304,12.384 cw(c9.599,10.09) 9.599,13.335 10.12,13.335 cw(c9.843,10.115) 12.319,12.192 12.445,12.066 cw(c9.854,9.734) 13.335,9.551 13.335,9.434 cw(c10.796,9.434) 12.591,7.638 12.047,7.094 cw(c10.251,8.89) 10.251,6.35 9.832,6.35 ccw(c9.831,5.917) 9.525,6.223 9.324,6.022 ccw(c9.757,5.588) 9.144,5.588 ccw(c9.757,5.588) 9.324,5.154 13.521,0.957 ccw(c14.605,2.041) 14.605,0.508 22.225,0.508 ccw(c22.225,0.889) 22.606,0.889 22.606,20.574 ccw(c22.225,20.574) 22.225,20.955
  region net GND_Sun_LED: 16.319,84.772 ccw(c16.28,84.772) 16.28,84.812 7.747,84.812 ccw(c7.747,82.272) 5.207,82.272 5.207,78.74 ccw(c5.334,78.74) 5.334,78.613 16.129,78.613
  region net GND_Sun_LED: 5.207,81.153 5.207,76.835 ccw(c7.747,76.835) 7.747,74.295 17.998,74.295 ccw(c17.998,75.601) 19.304,75.601 19.304,80.518 ccw(c15.684,81.153) 16.319,84.772 15.494,83.058
  region net P220: 91.821,53.467 89.39,51.036 ccw(c91.186,49.24) 88.646,49.24 88.646,45.847 ccw(c89.662,45.847) 89.662,44.831 100.457,44.831 cw(c100.457,42.799) 102.489,42.799 102.489,47.752 ccw(c99.949,47.752) 99.949,50.292 97.536,50.292
  region net GND_Sun_LED: 17.653,72.898 18.669,73.66 ccw(c16.643,75.397) 19.304,75.601 19.304,79.593 ccw(c16.764,79.593) 18.56,81.389 17.526,82.423 ccw(c15.993,80.89) 15.993,83.058 7.402,83.058 ccw(c7.402,80.518) 5.606,82.314 5.588,82.296 ccw(c6.508,81.376) 5.207,81.376 5.207,80.474 ccw(c6.941,80.474) 5.715,79.248 ccw(c6.941,80.474) 6.941,78.74 14.119,78.74 cw(c14.119,77.873) 14.732,78.486 cw(c14.119,77.873) 14.986,77.873 14.986,75.22 ccw(c17.526,75.22) 15.73,73.424 15.875,73.279
  region net GND-3.3v: 21.59,174.371 21.59,172.085 25.781,167.894 27.254,167.894 37.396,178.035 37.396,179.012 34.417,181.991 29.21,181.991
  pour cut-out: 31.115,169.164 29.21,169.164 27.686,167.64 25.146,167.64 21.082,171.704 21.082,174.371 29.083,182.372 34.036,182.372 37.465,178.943 37.465,175.514 36.576,174.625
  region net GND-3.3v: 29.21,169.164 29.083,169.164 25.4,165.481 29.718,161.163 30.607,161.163 31.877,162.433 31.877,166.624
  pour cut-out: 29.273,169.619 28.31,168.656 26.035,168.656 25.019,167.64 25.019,165.354 29.773,160.6 31.187,160.6 33.528,162.941 33.528,165.297 31.138,167.687
Bottom Layer:
  region net "Night lamp out": 97.681,66.298 cw(c98.548,66.298) 97.935,66.911 cw(c98.242,66.604) 98.242,67.038 104.503,67.038 cw(c104.503,64.498) 106.299,66.294 110.399,62.194 cw(c108.603,60.398) 111.143,60.398 111.143,57.549 cw(c108.603,57.549) 110.399,55.753 110.381,55.735 cw(c109.461,56.655) 109.461,55.354 106.353,55.354 cw(c106.353,57.894) 104.557,56.098 98.425,62.23 cw(c100.221,64.026) 97.681,64.026
  region net "Day lamp out": 99.314,69.85 ccw(c100.33,69.85) 100.33,68.834 104.267,68.834 ccw(c104.267,70.485) 105.918,70.485 105.918,70.612 cw(c107.188,70.612) 107.188,71.882 110.236,71.882 110.617,72.263 110.617,79.248 ccw(c110.109,79.248) 110.109,79.756 100.965,79.756 ccw(c100.965,78.105) 99.314,78.105
  region net "Heater out": 99.314,98.806 ccw(c99.314,97.155) 97.663,97.155 97.663,93.218 ccw(c99.695,93.218) 99.695,91.186 109.093,91.186 ccw(c109.093,93.091) 110.998,93.091 110.998,96.774 ccw(c108.966,96.774) 108.966,98.806
  region net "Timer 2 out": 99.441,114.935 ccw(c99.441,113.284) 97.79,113.284 97.79,109.347 ccw(c99.822,109.347) 99.822,107.315 109.22,107.315 ccw(c109.22,109.22) 111.125,109.22 111.125,112.903 ccw(c109.093,112.903) 109.093,114.935
  region net "Cooler out": 99.314,130.81 ccw(c99.314,129.159) 97.663,129.159 97.663,125.222 ccw(c99.695,125.222) 99.695,123.19 109.093,123.19 ccw(c109.093,125.095) 110.998,125.095 110.998,128.778 ccw(c108.966,128.778) 108.966,130.81
  region net "Timer 1 out": 99.441,146.685 ccw(c99.441,145.034) 97.79,145.034 97.79,141.097 ccw(c99.822,141.097) 99.822,139.065 109.22,139.065 ccw(c109.22,140.97) 111.125,140.97 111.125,144.653 ccw(c109.093,144.653) 109.093,146.685
  region net "Humidity out": 90.176,149.425 cw(c91.572,149.425) 91.573,150.822 98.812,150.822 ccw(c98.812,152.355) 99.896,151.271 101.098,152.473 ccw(c100.791,152.779) 101.225,152.779 101.225,163.486 cw(c103.764,163.486) 101.968,165.282 102.241,165.554 cw(c103.467,164.327) 103.467,166.062 110.75,166.062 cw(c110.75,165.756) 110.966,165.972 111.004,165.935 cw(c110.697,165.628) 111.131,165.628 111.131,159.839 cw(c106.464,162.905) 107.538,157.426 107.321,157.426 ccw(c107.32,155.893) 106.237,156.977 105.924,156.664 ccw(c106.536,156.051) 105.67,156.05 105.67,152.001 cw(c103.13,152) 104.926,150.205 101.86,147.139 90.621,147.139 cw(c91.555,148.683) 90.176,147.52
  region net GND-12v: 8.382,99.568 6.223,99.568 ccw(c6.223,98.298) 4.953,98.298 4.953,96.012 ccw(c5.842,96.012) 5.842,95.123 8.89,95.123 ccw(c8.89,95.377) 9.144,95.377
  region net "Tab 5v": 24.003,20.955 ccw(c24.003,20.447) 23.495,20.447 23.495,1.016 ccw(c24.003,1.016) 24.003,0.508 42.382,0.508 ccw(c42.382,3.048) 44.178,1.252 45.611,2.685 ccw(c43.815,4.481) 46.355,4.481 46.355,20.193 ccw(c45.593,20.193) 45.593,20.955
  region net "Tab 3.3 stm32": 8.763,20.955 cw(c8.763,21.844) 7.874,21.844 7.874,30.226 ccw(c6.985,30.226) 6.985,31.115 1.27,31.115 ccw(c1.27,30.48) 0.635,30.48 0.635,15.022 ccw(c3.175,15.022) 1.379,13.226 4.588,10.017 ccw(c5.579,11.594) 5.993,9.778 ccw(c5.993,10.024) 6.167,9.85 6.223,9.906 6.223,10.251 cw(c8.763,10.251) 6.967,12.047 7.304,12.384 cw(c9.599,10.09) 9.599,13.335 10.12,13.335 cw(c9.843,10.115) 12.319,12.192 12.445,12.066 cw(c9.854,9.734) 13.335,9.551 13.335,9.434 cw(c10.796,9.434) 12.591,7.638 12.047,7.094 cw(c10.251,8.89) 10.251,6.35 9.832,6.35 ccw(c9.831,5.917) 9.525,6.223 9.324,6.022 ccw(c9.757,5.588) 9.144,5.588 ccw(c9.757,5.588) 9.324,5.154 13.521,0.957 ccw(c14.605,2.041) 14.605,0.508 22.225,0.508 ccw(c22.225,0.889) 22.606,0.889 22.606,20.574 ccw(c22.225,20.574) 22.225,20.955
  region net "Sun out": 91.313,44.45 ccw(c91.313,41.91) 88.773,41.91 88.773,41.783 ccw(c91.313,41.783) 91.313,39.243 108.585,39.243 ccw(c108.585,41.529) 110.871,41.529 110.871,41.91 ccw(c108.331,41.91) 108.331,44.45 106.426,44.45
  pour cut-out: 31.115,169.164 29.21,169.164 27.686,167.64 25.146,167.64 21.082,171.704 21.082,174.371 29.083,182.372 34.036,182.372 37.465,178.943 37.465,175.514 36.576,174.625
  pour cut-out: 29.273,169.619 28.31,168.656 26.035,168.656 25.4,168.021 25.4,164.973 29.21,161.163 31.75,161.163 33.528,162.941 33.528,165.297 31.138,167.687

## Silkscreen, mask and mechanical layers (free items; w line width, h text height)
Top Overlay:
  lines w0.5: 22.098,159.385 24.13,159.385 ; 23.114,158.369 23.114,160.401
  text "R" at 30.218,157.091 h1.7
  text "G" at 30.218,155.079 h1.7
  text "CLK" at 30.218,152.537 h1.7
  text "DIO" at 30.345,150.38 h1.7
  text "3v3" at 30.218,147.459 h1.7
Bottom Overlay:
  lines w0.2: 16.129,46.101 17.399,46.101 17.399,47.752 ; 16.51,47.752 17.399,47.752 ; 18.415,47.752 18.288,47.879 18.288,51.816 18.542,51.816 22.606,51.816 22.606,47.752 17.399,47.752 ; 34.417,167.259 37.973,163.703 37.973,163.686 35.45,161.163 35.433,161.163 34.036,162.56 33.909,162.687 36.418,165.196 36.48,165.196
Top Solder:
  region: 49.403,98.171 cw(c49.403,95.631) 51.943,95.631 51.943,92.583 cw(c49.403,92.583) 49.403,90.043 46.355,90.043 cw(c46.355,92.583) 43.815,92.583 43.815,95.631 cw(c46.355,95.631) 46.355,98.171 46.863,98.171
  region: 35.369,48.514 35.369,22.225 43.37,22.225 ccw(c43.37,24.765) 45.91,24.765 45.91,48.514
  region: 24.003,20.955 ccw(c24.003,20.447) 23.495,20.447 23.495,1.016 ccw(c24.003,1.016) 24.003,0.508 42.382,0.508 ccw(c42.382,3.048) 44.178,1.252 45.611,2.685 ccw(c43.815,4.481) 46.355,4.481 46.355,20.193 ccw(c45.593,20.193) 45.593,20.955
  region: 8.763,20.955 cw(c8.763,21.844) 7.874,21.844 7.874,30.226 ccw(c6.985,30.226) 6.985,31.115 1.27,31.115 ccw(c1.27,30.48) 0.635,30.48 0.635,15.022 ccw(c3.175,15.022) 1.379,13.226 4.588,10.017 ccw(c5.579,11.594) 5.993,9.778 ccw(c5.993,10.024) 6.167,9.85 6.223,9.906 6.223,10.251 cw(c8.763,10.251) 6.967,12.047 7.304,12.384 cw(c9.599,10.09) 9.599,13.335 10.12,13.335 cw(c9.843,10.115) 12.319,12.192 12.445,12.066 cw(c9.854,9.734) 13.335,9.551 13.335,9.434 cw(c10.796,9.434) 12.591,7.638 12.047,7.094 cw(c10.251,8.89) 10.251,6.35 9.832,6.35 ccw(c9.831,5.917) 9.525,6.223 9.324,6.022 ccw(c9.757,5.588) 9.144,5.588 ccw(c9.757,5.588) 9.324,5.154 13.521,0.957 ccw(c14.605,2.041) 14.605,0.508 22.225,0.508 ccw(c22.225,0.889) 22.606,0.889 22.606,20.574 ccw(c22.225,20.574) 22.225,20.955
  lines w1.5: 85.199,59.53 93.345,59.53 ; 85.199,91.407 92.837,91.407 ; 85.304,123.317 92.837,123.317 ; 85.304,139.192 91.567,139.192 cw(c91.567,137.922) 92.837,137.922 92.837,136.271 ; 85.326,107.409 92.837,107.409 ; 109.22,33.503 106.451,33.503 104.013,35.941 104.013,47.138 102.383,48.768 98.171,48.768 93.345,53.594 93.345,65.278 95.765,67.698 95.765,80.003 92.837,82.931 92.837,136.271 ; 92.837,136.271 ccw(c92.837,136.271) 92.837,136.271
  lines w2: 16.955,72.072 16.955,76.948
Bottom Solder:
  drawing of 33 lines, arcs and shapes, not listed
  text "DAYA_ELEC" at 98.298,190.627 h2.5
Drill Guide:
  lines w2: 44.577,-0.381 46.854,1.896 ccw(c44.686,4.064) 47.752,4.064 47.752,6.985 47.752,11.811 ; 47.752,4.953 47.752,3.683 ccw(c50.818,3.683) 48.65,1.515 50.673,-0.508 ; 47.752,14.351 47.752,38.862 cw(c49.022,38.862) 49.022,40.132 57.531,40.132 ; 60.833,40.132 65.659,40.132 ; 68.707,40.132 77.978,40.132 cw(c77.978,38.862) 79.248,38.862 79.248,14.605 ; 76.046,-0.107 78.323,2.17 ccw(c76.155,4.338) 79.221,4.338 ; 79.198,3.952 79.198,11.826 ; 79.221,3.957 ccw(c82.287,3.957) 80.119,1.789 82.142,-0.234
Mechanical 1:
  lines w0.254: 25.843,71.183 6.666,71.183 6.666,58.991 26.097,58.991 26.097,71.183 ; 40.005,0 40.64,0 41.021,0
  lines w0.4: 0,54.102 10.033,54.102 10.033,63.627 0,63.627 ; 0,132.334 10.033,132.334 10.033,142.24 0,142.24 ; 53.213,0 53.213,10.033 63.881,10.033 63.881,0 ; 53.213,196.088 53.213,186.055 63.881,186.055 63.881,195.834 ; 117.221,54.102 107.061,54.102 107.061,63.627 117.221,63.627 ; 117.221,132.334 106.68,132.334 106.68,142.24 117.221,142.24
Mechanical 2:
  circle w0.254: c35.433,80.391 r2.618
  circle w0.254: c35.306,105.537 r2.742
  lines w0.4: 16.51,16.637 16.51,179.578 100.711,179.578 100.711,16.51 16.637,16.51 16.51,16.637
  lines w2: 21.209,113.411 ccw(c21.209,112.141) 19.939,112.141 19.939,75.184 ccw(c21.209,75.184) 21.209,73.914 50.165,73.914 ccw(c50.165,75.184) 51.435,75.184 51.435,112.141 ccw(c50.165,112.141) 50.165,113.411 21.844,113.411

## Dimensions
116.205,196.088 to 116.205,0 on Mechanical 1
0,196.088 to 116.205,196.088 on Mechanical 1

## Text inside footprints (layer, text, board x,y; h text height)
BT1: Top Overlay "3v" at 14.584,173.077 h1.52 r225; Top Overlay "BAT" at 18.169,170.199 h1.52 r225
C2: Top Overlay "+" at 68.531,169.103 h1 r270
C3: Top Overlay "+" at 17.695,128.516 h0.5 r90
C4: Top Overlay "+" at 17.702,124.441 h0.5 r90
C5: Top Overlay "+" at 38.288,74.627 h1
C8: Top Overlay "+" at 22.283,43.229 h1 r180
C9: Top Overlay "+" at 2.751,41.48 h0.5
C11: Top Overlay "+" at 32.705,27.989 h1 r180
C12: Top Overlay "+" at 12.223,28.227 h0.5 r180
K5: Bottom Overlay "NC" at 96.063,133.604 h1.5 r270; Bottom Overlay "NO" at 95.885,142.443 h1.5 r270; Bottom Overlay "COM" at 87.147,137.211 h1.5 r270
K6: Bottom Overlay "NC" at 96.063,117.729 h1.5 r270; Bottom Overlay "NO" at 95.885,126.568 h1.5 r270; Bottom Overlay "COM" at 87.147,121.336 h1.5 r270
K7: Bottom Overlay "NC" at 96.085,101.821 h1.5 r270; Bottom Overlay "NO" at 95.907,110.66 h1.5 r270; Bottom Overlay "COM" at 87.169,105.428 h1.5 r270
K8: Bottom Overlay "NC" at 95.958,85.819 h1.5 r270; Bottom Overlay "NO" at 95.78,94.658 h1.5 r270; Bottom Overlay "COM" at 87.042,89.426 h1.5 r270
K9: Bottom Overlay "NC" at 95.958,53.942 h1.5 r270; Bottom Overlay "NO" at 95.78,62.781 h1.5 r270; Bottom Overlay "COM" at 87.042,57.549 h1.5 r270
Sp1: Top Overlay "1" at 14.317,132.588 h1 r180; Mechanical 14 "1" at 14.317,132.588 h1 r180
U9: Mechanical 13 "ANTENNA" at 42.895,82.948 h1.78 r180